# Altium PCB ESP32_S3_TypeC.PcbDoc (part 1 of 2)
Units mil, origin at the board's own origin, x right, y up, seen from the top; angles counter-clockwise.
Board outline 2950 x 1300 mil, 2 copper layers (Top Layer, Bottom Layer), stack 86.615 mil thick; 51 components, 70 nets, 263 pads, 197 vias.
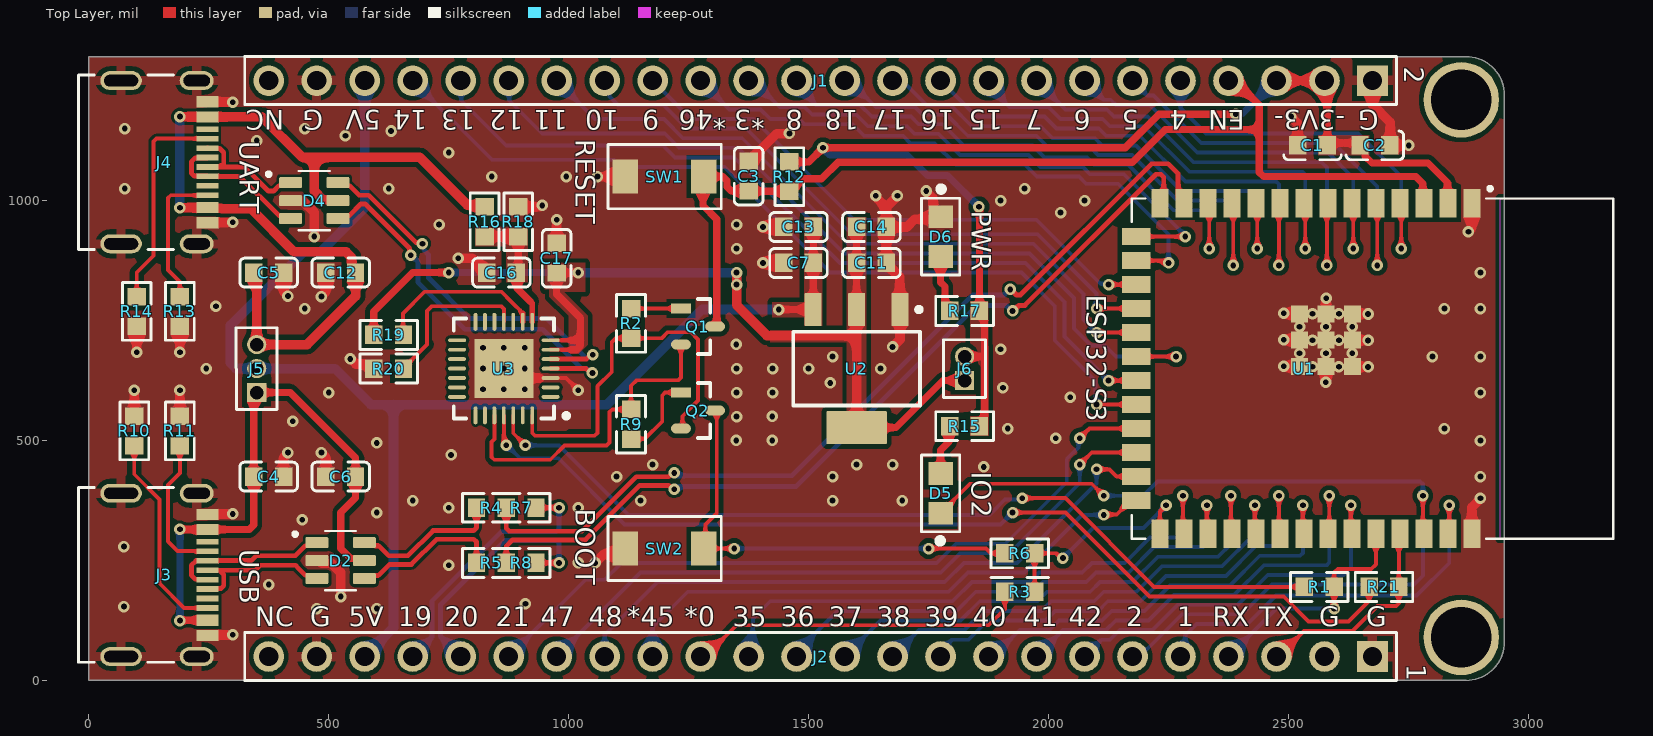
[diagram p0: Top Layer view]
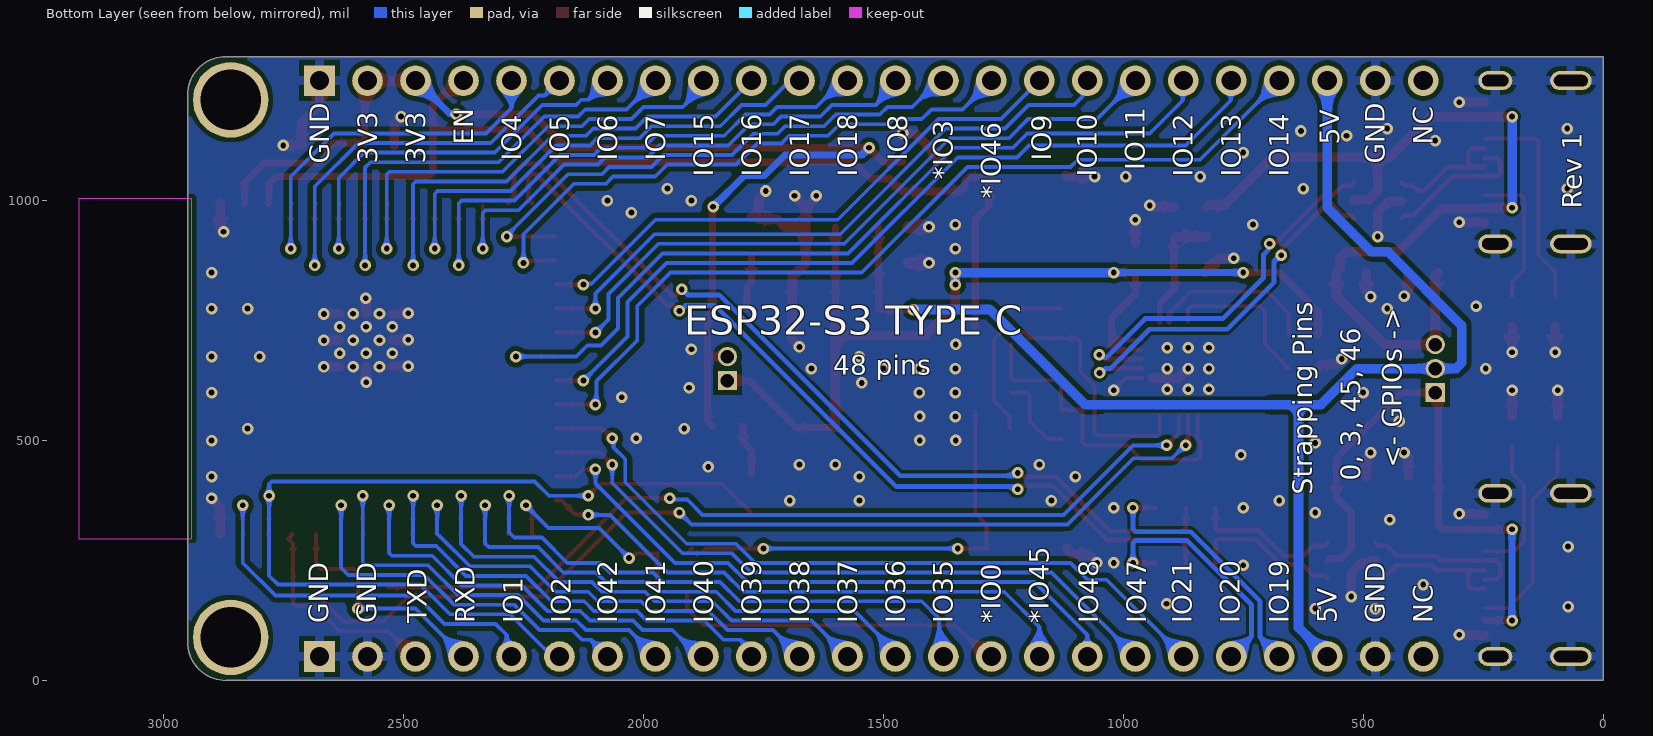
[diagram p1: Bottom Layer view, seen from below]

## Layer stack, top to bottom
Top Solder: solder mask 0.394, Solder Resist, Dk 3.5
Top Layer: signal copper 13.78
Dielectric 1: dielectric 59.055, FR-4, Dk 4.8
Bottom Layer: signal copper 13.78
Bottom Solder: solder mask 0.394, Solder Resist, Dk 3.5

## Board outline
0,0 0,1300 2870,1300 cw(c2870,1220) 2950,1220 2950,80 cw(c2870,80) 2870,0
cut-out: 0,-4900 0,-3900 2500,-3900 2500,-4900 0,-4900 0,-3900 2500,-3900 2500,-4900

## Design rules (kind name [scope] priority, off if disabled: settings)
Clearance DIFF90_Clearance [InDifferentialPairClass('DIFF90')] p1: gap=6 ignorepadtopadclearanceinfootprint=FALSE
Clearance CP2102(Smaller) [WithinRoom('CP2102') or withinRoom('USBC_UART') or WithinRoom('USBC_USB')] p2: gap=6 ignorepadtopadclearanceinfootprint=FALSE
Clearance [All] p3: gap=10 ignorepadtopadclearanceinfootprint=FALSE except(6: SMDPad-SMDPad; 7: Arc-Text Track-Text SMDPad-Text THPad-Text Via-Text Text-Text; 13.78: Arc-THPad Track-THPad)
ComponentClearance R4R7 [InComponent('R4') vs InComponent('R7')] p1: gap=-1 collisioncheckmode=3 verticalgap=0 showdistances=FALSE
ComponentClearance R5R8 [InComponent('R5') vs InComponent('R8')] p2: gap=-1 collisioncheckmode=3 verticalgap=0 showdistances=FALSE
ComponentClearance [All] p3: gap=10 collisioncheckmode=3 verticalgap=10 showdistances=FALSE
DiffPairsRouting DIFF90 [InDifferentialPairClass('DIFF90')] p1: maxlimit=12 minlimit=8 mostfreqgap=10 toplayer_minwidth=10 toplayer_maxwidth=10 toplayer_prefwidth=10 bottomlayer_minwidth=10 bottomlayer_maxwidth=10 bottomlayer_prefwidth=10 maxuncoupledlength=500
Height [All] p1 off: minheight=0 maxheight=1000 prefheight=500
HoleSize [All] p1: absolutevalues=TRUE maxlimit=248.03 minlimit=11.81 maxpercent=80.000 minpercent=20.000
MinimumSolderMaskSliver [All] p1: minsoldermaskwidth=0.1
PolygonConnect [All] p1: thpad.connectstyle=Relief thpad.reliefconductorwidth=20 thpad.reliefentries=4 thpad.polygonreliefangle="90 Angle" thpad.airgapwidth=10 smdpad.connectstyle=Direct smdpad.reliefconductorwidth=10 smdpad.reliefentries=4 smdpad.polygonreliefangle="90 Angle" smdpad.airgapwidth=10 via.connectstyle=Direct via.reliefconductorwidth=10 via.reliefentries=4 via.polygonreliefangle="90 Angle" via.airgapwidth=10
RoomDefinition USBC_USB [False vs False] p1: confinementstyle=ConfineIn formatcopy=TRUE lockcomponents=FALSE outline 315,450 -35,450 -35,-5 315,-5
RoomDefinition USBC_UART [False vs False] p2: confinementstyle=ConfineIn formatcopy=TRUE lockcomponents=FALSE outline 305,875 -35,875 -35,1300 305,1300
RoomDefinition CP2102 [False vs False] p3: confinementstyle=ConfineIn formatcopy=TRUE lockcomponents=FALSE outline 695,790 1050,790 1050,498.79 695,498.79
RoutingVias [All] p1: holewidth=12 width=24 viastyle="Through Hole" minholewidth=12 minwidth=20 maxholewidth=12 maxwidth=24
SilkToSilkClearance [All] p1: silktosilkclearance=6
SilkToSolderMaskClearance [IsPad] p1: minsilkscreentomaskgap=6 clearancetoexposedcopper=TRUE
SolderMaskExpansion [All] p1: expansion=1 istentingtop=FALSE
SupplyNets "Schematic Supply Nets_5" [InNet('3V3_REG')] p1: voltage=0.000
SupplyNets "Schematic Supply Nets_4" [InNet('GND')] p2: voltage=0.000
SupplyNets "Schematic Supply Nets_3" [InNet('5V_VBUS2')] p3: voltage=0.000
SupplyNets "Schematic Supply Nets_2" [InNet('5V_VBUS1')] p4: voltage=0.000
SupplyNets "Schematic Supply Nets_1" [InNet('VCC_5V')] p5: voltage=0.000
SupplyNets "Schematic Supply Nets" [InNet('3V3_EXT')] p6: voltage=0.000
UnRoutedNet [All] p1: checkbadconnections=TRUE
Width [All] p1: maxlimit=30 minlimit=8 preferedwidth=10 minimp=50.000000 maximp=50.000000 favimp=50.000000
22 further rules are at their usual default settings.

## Classes and differential pairs
differential pair class DIFF90: CON CON1_USB CON2_USB CON_HEADER ESP_USB USB_OTG_TVS USB_UART_TVS
differential pair CON2_USB: +CON2_USB_P -CON2_USB_N
differential pair CON1_USB: +CON1_USB_P -CON1_USB_N
differential pair USB_UART_TVS: +USB_UART_TVS_P -USB_UART_TVS_N
differential pair USB_OTG_TVS: +USB_OTG_TVS_P -USB_OTG_TVS_N
differential pair CON_HEADER: +CON_HEADER_P -CON_HEADER_N
differential pair ESP_USB: +ESP_USB_P -ESP_USB_N

## Components (designator, comment, footprint, x,y, rotation, side; value= is the part's Value field where it differs from the comment)
C1 "100nF 0603" CAPC1608X90N 2550,1115 r0 top
C2 "10uF 0603" CAPC1608X90N 2680,1115 r180 top value=10uF
C3 "1uF 0603" CAPC1608X90N 1375,1051 r270 top value=1uF
C4 "10uF 0603" CAPC1608X90N 375,425 r0 top value=10uF
C5 "10uF 0603" CAPC1608X90N 375,850 r0 top value=10uF
C6 "100nF 0603" CAPC1608X90N 525,425 r180 top
C7 "100nF 0603" CAPC1608X90N 1479,870 r0 top
C11 "100nF 0603" CAPC1608X90N 1631,870 r180 top
C12 "100nF 0603" CAPC1608X90N 525,850 r180 top
C13 "10uF 0603" CAPC1608X90N 1479,945 r0 top value=10uF
C14 "10uF 0603" CAPC1608X90N 1631,945 r180 top value=10uF
C16 "1uF 0603" CAPC1608X90N 860,850 r0 top value=1uF
C17 "10uF 0603" CAPC1608X90N 975,880 r270 top value=10uF
D2 "6A 12V 150W 6V Unidirectional 5V SOT-23-6 ESD and Surge Protection (TVS/ESD) ROHS" SOT95P280X145-6N 525,250 r0 top
D4 "6A 12V 150W 6V Unidirectional 5V SOT-23-6 ESD and Surge Protection (TVS/ESD) ROHS" SOT95P280X145-6N 470,1000 r0 top
D5 "LED GREEN CLEAR 0805 SMD" "LED 0805" 1775,390 r270 top
D6 "LED RED CLEAR 0805 SMD" "LED 0805" 1775,925 r90 top
J1 "CONN HEADER VERT 24POS 2.54MM" HEADER_1X24 2675,1250 r270 top locked
J2 "CONN HEADER VERT 24POS 2.54MM" HEADER_1X24 2675,50 r270 top locked
J3 "USB-C 24-Pins" MOLEX_2171790001 157.58,220.08 r270 top locked
J4 "USB-C 24-Pins" MOLEX_2171790001 157.58,1079.92 r270 top locked
J5 "1X3P 1.27mm Header" "HEADER 1X3_1.27MM" 350,600 r180 top
J6 "1X2P 1.27mm Header" "HEADER 1X2_1.27MM" 1825,625 r180 top
Q1 "TRANS NPN 25V 1.5A SOT23-3" FP-SS8050-G-IPC_C 1269.39,737.6 r0 top
Q2 "TRANS NPN 25V 1.5A SOT23-3" FP-SS8050-G-IPC_C 1269.39,562.6 r0 top
R1 "0Ohms 0603" 0603_RES_1/10W 2564,195 r0 top value=0R
R2 "10kOhms 0603" RES1608_0603 1130,744 r90 top value=10kR
R3 "27Ohms 0603" RES1608_0603 1940,185 r0 top value=27R
R4 "0Ohms 0603" 0603_RES_1/10W 839,360 r180 top value=0R
R5 "0Ohms 0603" 0603_RES_1/10W 839,245 r180 top value=0R
R6 "27Ohms 0603" RES1608_0603 1940,265 r0 top value=27R
R7 "0Ohms 0603" 0603_RES_1/10W 901,360 r0 top value=0R
R8 "0Ohms 0603" 0603_RES_1/10W 901,245 r0 top value=0R
R9 "10kOhms 0603" RES1608_0603 1130,534 r270 top value=10kR
R10 "5.1KOhms 0603" RES1608_0603 95,520 r270 top value=5.1kR
R11 "5.1KOhms 0603" RES1608_0603 190,520 r270 top value=5.1kR
R12 "10kOhms 0603" RES1608_0603 1460,1050 r90 top value=10kR
R13 "5.1KOhms 0603" RES1608_0603 190,769 r90 top value=5.1kR
R14 "5.1KOhms 0603" RES1608_0603 100,769 r90 top value=5.1kR
R15 "1KOhms 0603" RES1608_0603 1825,530 r0 top value=1kR
R16 "22.1KOhms 0603" RES1608_0603 825,956 r90 top value=22.1kR
R17 "1KOhms 0603" RES1608_0603 1825,770 r180 top value=1kR
R18 "47.5KOhms 0603" RES1608_0603 895,956 r270 top value=4.75kR
R19 "1KOhms 0603" RES1608_0603 625,720 r0 top value=1kR
R20 "10kOhms 0603" RES1608_0603 625,650 r180 top value=10kR
R21 "0Ohms 0603" 0603_RES_1/10W 2699,195 r0 top value=0R
SW1 "3x4 2pins SMD" SW_TS-1088-AR02016 1200,1050 r0 top
SW2 "3x4 2pins SMD" SW_TS-1088-AR02016 1200,275 r0 top
U1 "ESP32-S3-WROOM1" XCVR_ESP32-S3-WROOM-1-N16R2 2675,650 r270 top locked
U2 "LM1117MP-3.3/NOPB" SOT223-4 1600,650 r270 top
U3 "CP2102-GMR" SLAB-QFN-28-3125X3125TP_M 865,650 r180 top

## Footprints (in the part's own frame and the unit in brackets; to place one, negate y for a bottom-side part, rotate by r counter-clockwise, add the part's x,y. Pads: shape width x height; smd on the part's side, far side on the other; paste and mask are expansions set on the pad)
0603_RES_1/10W [mm] "1608 Metric_0603 Imperial"
  rect 0.92x0.98 smd: 1(-0.787,0) 2(0.787,0)
  silkscreen extent -1.52,-0.76 1.52,0.76, body extent -0.8,-0.4 0.8,0.4, height 0.55
CAPC1608X90N [mm] "1608 Metric_0603 Imperial"
  rect 0.92x0.98 smd: 1(-0.787,0) 2(0.787,0)
  silkscreen extent -1.52,-0.76 1.52,-0.51, body extent -0.8,-0.41 0.8,0.41, height 0.9
FP-SS8050-G-IPC_C [mm] "High Density"
  rect 1.057x0.532 smd paste+0 mask+0: 1(-0.901,0.95)
  rrect100% 1.057x0.532 smd paste+0 mask+0: 2(-0.901,-0.95) 3(0.901,0)
  silkscreen extent 0,-1.45 0.65,1.45, body extent -1.53,-1.55 1.53,1.55, height 0.25
"HEADER 1X2_1.27MM" [mil] "Tin 1A Direct Insert Policy 1mm 2P 3mm -40℃~+105℃ 2.3mm 1.27mm Single Row Brass Black Plugin,P=1.27mm Pin Headers ROHS"
  rect 40x40 hole 28: 1(0,0)
  round 40 hole 28: 2(0,-50)
  silkscreen extent -44,-85 44,35, body extent -41,-75 41,25, height 157
"HEADER 1X3_1.27MM" [mil] "Gold 250V 1A Policy 1mm 3P -40℃~+105℃ 1.27mm Single Row Black Brass 1.27mm 1x3P Plugin,P=1.27mm Pin Headers ROHS"
  rect 40x40 hole 28: 1(0,0)
  round 40 hole 28: 2(0,-50) 3(0,-100)
  silkscreen extent -42,-135 43,35, body extent -42,-125 42,25, height 158
HEADER_1X24 [mil] "TE Connectivity"
  rect 64x64 hole 40: 1(0,0)
  round 64 hole 40: 2(0,-100) 3(0,-200) 4(0,-300) 5(0,-400) 6(0,-500) 7(0,-600) 8(0,-700) 9(0,-800) 10(0,-900) 11(0,-1000) 12(0,-1100) 13(0,-1200) 14(0,-1300) 15(0,-1400) 16(0,-1500) 17(0,-1600) 18(0,-1700) 19(0,-1800) 20(0,-1900) 21(0,-2000) 22(0,-2100) 23(0,-2200) 24(0,-2300)
  silkscreen extent -50,-2350 50,50, body extent -50,-2350 50,50, height 418
"LED 0805" [mm]
  rect 1.2x1.3 smd: 1(-1.05,0) 2(1.05,0)
  silkscreen extent -2.03,-1.02 2.57,1.02, body extent -1,-0.63 1,0.63, height 0.7
MOLEX_2171790001 [mm]
  rect 0.59x1.15 smd mask+0.038: A1B12(-3.2,2.288) A4B9(-2.4,2.288) B1A12(3.2,2.288) B4A9(2.4,2.288)
  rect 0.298x1.15 smd mask+0.038: A5(-1.25,2.288) A6(-0.25,2.288) A7(0.25,2.288) A8(1.25,2.288) B5(1.75,2.288) B6(0.75,2.288) B7(-0.75,2.288) B8(-1.75,2.288)
  oval 1x2.2 hole 0.6 slot 1.8 at 90 deg mask+0.038: S1(-4.32,-2.287) S2(4.32,-2.287)
  oval 1x1.8 hole 0.6 slot 1.4 at 90 deg mask+0.038: S3(-4.32,1.713) S4(4.32,1.713)
  silkscreen extent -4.62,-4.54 4.62,0.49, body extent -4.47,-4.51 4.47,2.24, height 3.27
RES1608_0603 [mm] "1608 Metric_0603 Imperial"
  rect 0.92x0.98 smd: 1(-0.787,0) 2(0.787,0)
  silkscreen extent -1.52,-0.76 1.52,0.76, body extent -0.8,-0.4 0.8,0.4, height 0.55
SLAB-QFN-28-3125X3125TP_M [mm] "QFN, 28-Leads, Body 5x5mm, Pitch 0.5mm, Thermal Pad 3.13x3.13mm, IPC Low Density"
  oval 0.95x0.2 smd mask+0.038: 1(-2.475,1.5) 2(-2.475,1) 3(-2.475,0.5) 4(-2.475,0) 5(-2.475,-0.5) 6(-2.475,-1) 7(-2.475,-1.5) 15(2.475,-1.5) 16(2.475,-1) 17(2.475,-0.5) 18(2.475,0) 19(2.475,0.5) 20(2.475,1) 21(2.475,1.5)
  oval 0.2x0.95 smd mask+0.038: 8(-1.5,-2.475) 9(-1,-2.475) 10(-0.5,-2.475) 11(0,-2.475) 12(0.5,-2.475) 13(1,-2.475) 14(1.5,-2.475) 22(1.5,2.475) 23(1,2.475) 24(0.5,2.475) 25(0,2.475) 26(-0.5,2.475) 27(-1,2.475) 28(-1.5,2.475)
  rect 3.13x3.13 smd mask+0.038: 29(0,0)
  silkscreen extent -3.42,-2.65 2.65,2.65, body extent -2.5,-2.5 2.5,2.5, height 1
SOT95P280X145-6N [mm]
  rrect25% 1.21x0.59 smd: 1(-1.255,0.95) 2(-1.255,0) 3(-1.255,-0.95) 4(1.255,-0.95) 5(1.255,0) 6(1.255,0.95)
  silkscreen extent -2.51,-1.57 0.81,1.57, body extent -1.4,-1.46 1.4,1.46, height 1.42
SOT223-4 [mm] "SOT223, 4-Leads, Body 6.7x3.7mm, Pitch 2.3mm, IPC Medium Density"
  rrect11% 1.75x0.9 smd: 1(-3.125,2.3) 2(-3.125,0) 3(-3.125,-2.3)
  rrect6% 1.75x3.2 smd: 4(3.125,0)
  silkscreen extent -3.25,-3.35 1.95,3.43, body extent -3.5,-3.25 3.5,3.25, height 1.62
SW_TS-1088-AR02016 [mm]
  rect 1.35x1.8 smd: 1(-2.075,0) 2(2.075,0)
  silkscreen extent -3,-1.7 3,1.7, body extent -2.4,-1.45 2.4,1.45, height 2
XCVR_ESP32-S3-WROOM-1-N16R2 [mm]
  rect 1.5x0.9 smd: 2(-8.75,3.99) 3(-8.75,2.72) 4(-8.75,1.45) 5(-8.75,0.18) 6(-8.75,-1.09) 7(-8.75,-2.36) 8(-8.75,-3.63) 9(-8.75,-4.9) 10(-8.75,-6.17) 11(-8.75,-7.44) 12(-8.75,-8.71) 13(-8.75,-9.98) 14(-8.75,-11.25) 27(8.75,-11.25) 28(8.75,-9.98) 29(8.75,-8.71) 30(8.75,-7.44) 31(8.75,-6.17) 32(8.75,-4.9) 33(8.75,-3.63) 34(8.75,-2.36) 35(8.75,-1.09) 36(8.75,0.18) 37(8.75,1.45) 38(8.75,2.72) 39(8.75,3.99) GND(-8.75,5.26) GND(8.75,5.26)
  rect 0.9x1.5 smd: 15(-6.985,-12.5) 16(-5.715,-12.5) 17(-4.445,-12.5) 18(-3.175,-12.5) 19(-1.905,-12.5) 20(-0.635,-12.5) 21(0.635,-12.5) 22(1.905,-12.5) 23(3.175,-12.5) 24(4.445,-12.5) 25(5.715,-12.5) 26(6.985,-12.5)
  rect 0.9x0.9 smd: GND(-2.9,-2.46) GND(-2.9,-1.06) GND(-2.9,-3.86) GND(-1.5,-1.06) GND(-1.5,-2.46) GND(-1.5,-3.86) GND(-0.1,-1.06) GND(-0.1,-2.46) GND(-0.1,-3.86)
  Keep-Out Layer region: 9,6.75 -9,6.75 -9,12.75 9,12.75
  Keep-Out Layer region: 9,6.75 -9,6.75 -9,12.75 9,12.75
  silkscreen extent -9.62,-12.75 9,12.75, body extent -9,-12.75 9,12.75, height 3.25

## Part data
C1 C6 C7 C11 C12: library part CL10E104KC8VPNC, "0.1 µF ±10% 100V Ceramic Capacitor X8L 0603 (1608 Metric)", LCSC Part Number=C2687355, Manufacturer=Samsung, Supplier Part Number=1276-CL10E104KC8VPNCCT-ND, Category="Ceramic Capacitors", Manufacturer Part Number=CL10E104KC8VPNC, Pricing="1=0.27, 10=0.154, 50=0.11, 100=0.0962, 500=0.07284, 1000=0.06554 (USD)", RoHS=No, Stock=57576, Supplier=Digikey
C2 C4 C5 C13 C14 C17: library part CL10A106MQ8NNNC, "10 µF ±20% 6.3V Ceramic Capacitor X5R 0603 (1608 Metric)", Capacitor Type=Ceramic, Case/Package=0603, LCSC Part Number=C385035, Manufacturer=Samsung, Max Operating Temperature=85°C, Min Operating Temperature=-55°C, Package Shape=Rectangular, Package Style=SMTMeter, Rated DC Voltage (URdc)=6.3V, Supplier Part Number=1276-1119-1-ND, Temperature Characteristics Code=X5R, Tolerance  (fill in as +-)=20%, Category="Ceramic Capacitors", ComponentLink1Description=https://datasheet.ciiva.com:443/pdfs/VipMasterIC/IC/SEMS/SEMS-S-A0008522793/SEMS-S-A0008522915-1.pdf?src-supplier=IHS+Markit, ComponentLink1URL=https://datasheet.ciiva.com:443/pdfs/VipMasterIC/IC/SEMS/SEMS-S-A0008522793/SEMS-S-A0008522915-1.pdf?src-supplier=IHS+Markit, ComponentLink2Description=https://datasheet.ciiva.com/25798/cl10a106mq8nnnc-25798320.pdf?src-supplier=Digikey, ComponentLink2URL=https://datasheet.ciiva.com/25798/cl10a106mq8nnnc-25798320.pdf?src-supplier=Digikey, ComponentLink3Description=https://datasheet.ciiva.com/16437/cl05b104kq5nnnc-16437327.pdf?src-supplier=Future+Electronics, ComponentLink3URL=https://datasheet.ciiva.com/16437/cl05b104kq5nnnc-16437327.pdf?src-supplier=Future+Electronics, Dielectric Material=Ceramic, Height=0.8mm, JESD-609 Code=e3, Length=1.6mm, Manufacturer Part Number=CL10A106MQ8NNNC, Mounting Technology="Surface Mount", Multilayer=Yes, Packaging="Tape and Reel", Pins=2, Pricing="1=0.08, 10=0.037, 50=0.0292, 100=0.0216, 500=0.0184, 1000=0.0152, 4000=0.0136, 8000=0.0112, 12000=0.0104, 20000=0.01024 (USD)", Reach SVHC Compliant=Yes, RoHS=Yes, RoHS Compliant=Yes, Stock=1062557, Supplier=Digikey, Terminal Finish=Nickel, Termination=Wraparound, Tolerance (fill in as +-)=20%, Width=0.8mm
C3 C16: library part CL10B105KP8NNNC, "1 µF ±10% 10V Ceramic Capacitor X7R 0603 (1608 Metric)", Capacitor Type=Ceramic, Case/Package=0603, LCSC Part Number=C15849, Manufacturer=Samsung, Max Operating Temperature=125°C, Min Operating Temperature=-55°C, Package Shape=Rectangular, Package Style=SMTMeter, Rated DC Voltage (URdc)=10V, Supplier Part Number=1276-1946-1-ND, Temperature Characteristics Code=X7R, Tolerance  (fill in as +-)=10%, Category="Ceramic Capacitors", ComponentLink1Description=https://datasheet.ciiva.com:443/pdfs/VipMasterIC/IC/SEMS/SEMS-S-A0008526420/SEMS-S-A0008526450-1.pdf?src-supplier=IHS+Markit, ComponentLink1URL=https://datasheet.ciiva.com:443/pdfs/VipMasterIC/IC/SEMS/SEMS-S-A0008526420/SEMS-S-A0008526450-1.pdf?src-supplier=IHS+Markit, ComponentLink2Description=https://datasheet.ciiva.com/25788/cl10b105kp8nnnc-25788304.pdf?src-supplier=Digikey, ComponentLink2URL=https://datasheet.ciiva.com/25788/cl10b105kp8nnnc-25788304.pdf?src-supplier=Digikey, Dielectric Material=Ceramic, Height=0.9mm, JESD-609 Code=e3, Length=1.6mm, Manufacturer Part Number=CL10B105KP8NNNC, Mounting Technology="Surface Mount", Multilayer=Yes, Packaging="Tape and Reel", Pins=2, Pricing="1=0.08, 10=0.014, 50=0.0124, 100=0.0104, 500=0.0092, 1000=0.008, 4000=0.008, 8000=0.00638, 12000=0.006, 20000=0.00559, 28000=0.00535, 40000=0.00511, 100000=0.00461, 200000=0.00431 (USD)", Reach SVHC Compliant=Yes, RoHS=Yes, RoHS Compliant=Yes, Stock=6476393, Supplier=Digikey, Terminal Finish=Nickel, Termination=Wraparound, Tolerance (fill in as +-)=10%, Width=0.8mm
D2 D4: library part USBLC6-2SC6, Clamping Voltage-Max=17V, LCSC Part Number=C2827654, Manufacturer=STMicroelectronics, Max Operating Temperature=125°C, Min Breakdown Voltage=6V, Min Operating Temperature=-40°C, Package Body Material=Plastic, Package Shape=Rectangular, Package Style="SMALL OUTLINEMeter", Peak Reflow Temperature (Cel)=260°C, Rep Pk Reverse Voltage-Max=5V, Supplier Part Number=497-5235-1-ND, Additional Feature="HIGH RELIABILITY", Category="TVS Diodes", ComponentLink1Description=https://datasheet.ciiva.com:443/pdfs/VipMasterIC/IC/SGST/SGSTS30336/SGSTS30336-1.pdf?src-supplier=IHS+Markit, ComponentLink1URL=https://datasheet.ciiva.com:443/pdfs/VipMasterIC/IC/SGST/SGSTS30336/SGSTS30336-1.pdf?src-supplier=IHS+Markit, ComponentLink2Description=https://datasheet.ciiva.com/1268/1690354-1268384.pdf?src-supplier=Element14, ComponentLink2URL=https://datasheet.ciiva.com/1268/1690354-1268384.pdf?src-supplier=Element14, ComponentLink3Description=https://datasheet.ciiva.com/4508/cd00050750-113117-4508433.pdf?src-supplier=Mouser, ComponentLink3URL=https://datasheet.ciiva.com/4508/cd00050750-113117-4508433.pdf?src-supplier=Mouser, ComponentLink4Description=https://datasheet.ciiva.com/41444/001184109-da-01-en-ic-esd-protecti-usblc6-2sc6-sot-23-6-stm-41444156.pdf?src-supplier=Conrad, ComponentLink4URL=https://datasheet.ciiva.com/41444/001184109-da-01-en-ic-esd-protecti-usblc6-2sc6-sot-23-6-stm-41444156.pdf?src-supplier=Conrad, Diode Element Material=SILICON, Diode Type="TRANS VOLTAGE SUPPRESSOR", JESD-30 Code=R-PDSO-G6, JESD-609 Code=e3, Manufacturer Part Number=USBLC6-2SC6, Moisture Sensitivity Level=1, Number of Elements=1, Pins=6, Polarity=Unidirectional, Pricing="1=0.36, 10=0.243, 100=0.1639, 500=0.1269, 1000=0.11458 (USD)", Qualification Status="Not Qualified", Reach SVHC Compliant=Yes, Reference Standard=IEC-61000-4-2, RoHS=Yes, RoHS Compliant=Yes, Stock=105122, Supplier=Digikey, Surface Mount=Yes, Technology=AVALANCHE, Terminal Finish=Tin, Terminal Form="Gull Wing", Terminal Position=DUAL
D5: library part 150080VS75000, "Green 570nm LED Indication - Discrete 2V 0805 (2012 Metric)", Color=Green, Forward Current=30mA, LCSC Part Number=C84257, Manufacturer="Wurth Electronics", Max Operating Temperature=85°C, Min Operating Temperature=-40°C, Supplier Part Number=732-4986-1-ND, Category=LEDs, Channels=1, ComponentLink1Description=https://datasheet.ciiva.com:443/pdfs/VipMasterIC/IC/MIDC/MIDC-S-A0007455962/MIDC-S-A0007455962-1.pdf?src-supplier=IHS+Markit, ComponentLink1URL=https://datasheet.ciiva.com:443/pdfs/VipMasterIC/IC/MIDC/MIDC-S-A0007455962/MIDC-S-A0007455962-1.pdf?src-supplier=IHS+Markit, ComponentLink2Description=https://datasheet.ciiva.com/22656/150080vs75000-22656966.pdf?src-supplier=Element14, ComponentLink2URL=https://datasheet.ciiva.com/22656/150080vs75000-22656966.pdf?src-supplier=Element14, ComponentLink3Description=https://datasheet.ciiva.com/29279/759437-da-01-en-chipled-0805-w-kl-h-gruen-150080vs7500-29279047.pdf?src-supplier=Conrad, ComponentLink3URL=https://datasheet.ciiva.com/29279/759437-da-01-en-chipled-0805-w-kl-h-gruen-150080vs7500-29279047.pdf?src-supplier=Conrad, ComponentLink4Description=https://datasheet.ciiva.com/29563/150080vs75000-29563018.pdf?src-supplier=Digikey, ComponentLink4URL=https://datasheet.ciiva.com/29563/150080vs75000-29563018.pdf?src-supplier=Digikey, Lens Style="WATER CLEAR", Luminous Intensity-Nom=40mcd, Manufacturer Part Number=150080VS75000, Mounting Technology="Surface Mount", Optoelectronic Device Type="SINGLE COLOR LED", Overall Height=0.7mm, Packaging="Tape and Reel", Pins=2, Pricing="1=0.18, 50=0.176, 100=0.151, 500=0.131, 4000=0.131 (USD)", Reach SVHC Compliant=Yes, RoHS=Yes, RoHS Compliant=Yes, Shape=Rectangular, Size=1.4mm, Stock=33035, Supplier=Digikey, Terminal Pitch=2.1mm, Viewing Angle=140°
D6: library part 150080RS75000, "Red 625nm LED Indication - Discrete 2V 0805 (2012 Metric)", Color=Red, Forward Current=30mA, LCSC Part Number=C7496834, Manufacturer="Wurth Electronics", Max Operating Temperature=85°C, Min Operating Temperature=-40°C, Supplier Part Number=732-4984-1-ND, Category=LEDs, Channels=1, ComponentLink1Description=https://datasheet.ciiva.com:443/pdfs/VipMasterIC/IC/MIDC/MIDC-S-A0007455974/MIDC-S-A0007455974-1.pdf?src-supplier=IHS+Markit, ComponentLink1URL=https://datasheet.ciiva.com:443/pdfs/VipMasterIC/IC/MIDC/MIDC-S-A0007455974/MIDC-S-A0007455974-1.pdf?src-supplier=IHS+Markit, ComponentLink2Description=https://datasheet.ciiva.com/22656/150080rs75000-22656961.pdf?src-supplier=Element14, ComponentLink2URL=https://datasheet.ciiva.com/22656/150080rs75000-22656961.pdf?src-supplier=Element14, ComponentLink3Description=https://datasheet.ciiva.com/29279/759435-da-01-en-chipled-0805-w-kl-rot-150080rs75000-29279032.pdf?src-supplier=Conrad, ComponentLink3URL=https://datasheet.ciiva.com/29279/759435-da-01-en-chipled-0805-w-kl-rot-150080rs75000-29279032.pdf?src-supplier=Conrad, Lens Style="WATER CLEAR", Luminous Intensity-Nom=150mcd, Manufacturer Part Number=150080RS75000, Mounting Technology="Surface Mount", Optoelectronic Device Type="SINGLE COLOR LED", Overall Height=0.7mm, Packaging="Tape and Reel", Pins=2, Pricing="1=0.18, 50=0.176, 100=0.151, 500=0.131, 4000=0.131 (USD)", Reach SVHC Compliant=Yes, RoHS=Yes, RoHS Compliant=Yes, Shape=Rectangular, Size=1.4mm, Stock=52184, Supplier=Digikey, Terminal Pitch=2.1mm, Viewing Angle=140°
J1 J2: library part 0022284242, "Connector Header Through Hole 24 position 0.100\" (2.54mm)", LCSC Part Number=C5987590, Manufacturer=Molex, Supplier Part Number=WM50032-24-ND, Category=Uncategorized, ComponentLink1Description=http://components.arrow.com/part/dataview/4705328S3166250N3303?src-supplier=Arrow+Electronics, ComponentLink1URL=http://components.arrow.com/part/dataview/4705328S3166250N3303?src-supplier=Arrow+Electronics, ComponentLink2Description=http://www.molex.com/molex/products/datasheet.jsp?part=active/0022284242_PCB_HEADERS.xml&channel=Products&src-supplier=Avnet, ComponentLink2URL=http://www.molex.com/molex/products/datasheet.jsp?part=active/0022284242_PCB_HEADERS.xml&channel=Products&src-supplier=Avnet, ComponentLink3Description=https://www.molex.com/pdm_docs/sd/022284052_sd.pdf?src-supplier=Digikey, ComponentLink3URL=https://www.molex.com/pdm_docs/sd/022284052_sd.pdf?src-supplier=Digikey, Manufacturer Part Number=0022284242, Pricing="1=1.49, 10=1.119, 100=0.8715, 500=0.75016, 1000=0.70789, 5000=0.62818, 10000=0.6005 (USD)", RoHS=Yes, Supplier=Digikey
J3 J4: library part 217179-0001, "USB-C (USB TYPE-C) USB 2.0 Receptacle Connector 24 (16+8 Dummy) Position Surface Mount, Right Angle; Through Hole", Manufacturer=Molex, Supplier Part Number=900-2171790001CT-ND, Category=Connectors, Manufacturer Part Number=217179-0001, Pricing="1=0.98, 10=0.731, 25=0.6564, 50=0.6074, 100=0.5642, 250=0.51468, 500=0.48234, 1200=0.44689, 2400=0.42258, 3600=0.40973, 6000=0.39484, 8400=0.38577, 12000=0.37675 (USD)", RoHS=No, Stock=14292, Supplier=Digikey
J5: library part FTS-103-01-F-S, "Connector Header Through Hole 3 position 0.050\" (1.27mm)", Flammability Rating="UL94 V-0", LCSC Part Number=C2881648, Manufacturer=Samtec, Manufacturer Series=FTS, Supplier Part Number=612-FTS-103-01-F-S-ND, Additional Feature="Low Profile", Category=Connectors, ComponentLink1Description=https://datasheet.ciiva.com:443/pdfs/VipMasterIC/IC/SAMI/SAMI-S-A0001504673/SAMI-S-A0001504673-1.pdf?src-supplier=IHS+Markit, ComponentLink1URL=https://datasheet.ciiva.com:443/pdfs/VipMasterIC/IC/SAMI/SAMI-S-A0001504673/SAMI-S-A0001504673-1.pdf?src-supplier=IHS+Markit, ComponentLink2Description=http://suddendocs.samtec.com/prints/fts-1xx-xx-xx-xx-xx-mkt.pdf?src-supplier=Digikey, ComponentLink2URL=http://suddendocs.samtec.com/prints/fts-1xx-xx-xx-xx-xx-mkt.pdf?src-supplier=Digikey, ComponentLink3Description=http://www.samtec.com/documents/webfiles/pdf/FTS.pdf?src-supplier=Avnet, ComponentLink3URL=http://www.samtec.com/documents/webfiles/pdf/FTS.pdf?src-supplier=Avnet, ComponentLink4Description=https://datasheet.octopart.com/FTS-103-01-F-S-Samtec-datasheet-116535195.pdf?src-supplier=Toby+Electronics, ComponentLink4URL=https://datasheet.octopart.com/FTS-103-01-F-S-Samtec-datasheet-116535195.pdf?src-supplier=Toby+Electronics, ComponentLink5Description=https://datasheet.octopart.com/FTS-103-01-F-S-Samtec-datasheet-151470456.pdf?src-supplier=Sager+Electronics, ComponentLink5URL=https://datasheet.octopart.com/FTS-103-01-F-S-Samtec-datasheet-151470456.pdf?src-supplier=Sager+Electronics, Connector Type="BOARD CONNECTOR", Contact Finish - Mating="GOLD (3) OVER NICKEL (50)", Contact Finish - Termination="Matte Tin (Sn) - with Nickel (Ni) barrier", Contact Gender=Male, Contact Material=Bronze, DIN Conformance=No, Filter Feature=No, IEC Conformance=No, JESD-609 Code=e3, Manufacturer Part Number=FTS-103-01-F-S, MIL Conformance=No, Mixed Contacts=No, Mounting Style=STRAIGHT, Mounting Technology=Board, Number of Contacts=3, Number of Rows Loaded=1, Option="General Purpose", Pricing="1=0.73, 50=0.6378, 100=0.5407, 500=0.4491, 1000=0.38362, 2000=0.31431, 5000=0.2478, 10000=0.2375 (USD)", Reach SVHC Compliant=Yes, RoHS=Yes, RoHS Compliant=Yes, Stock=2712, Supplier=Digikey, Terminal Pitch=1.27mm, Termination=Solder
J6: library part M50-3530242, "Connector Header Through Hole 2 position 0.050\" (1.27mm)", Flammability Rating="UL94 V-0", LCSC Part Number=C3325334, Manufacturer=Harwin, Supplier Part Number=952-3598-ND, Category="Headers and Wire Housings", ComponentLink1Description=https://datasheet.ciiva.com:443/pdfs/VipMasterIC/IC/HRWN/HRWN-S-A0002541787/HRWN-S-A0002541787-1.pdf?src-supplier=IHS+Markit, ComponentLink1URL=https://datasheet.ciiva.com:443/pdfs/VipMasterIC/IC/HRWN/HRWN-S-A0002541787/HRWN-S-A0002541787-1.pdf?src-supplier=IHS+Markit, ComponentLink2Description=https://cdn.harwin.com/pdfs/Harwin_PC_Connectors_Archer.pdf?src-supplier=Digikey, ComponentLink2URL=https://cdn.harwin.com/pdfs/Harwin_PC_Connectors_Archer.pdf?src-supplier=Digikey, Connector Type="BOARD CONNECTOR", Contact Finish - Mating="NOT SPECIFIED", Contact Gender=Male, DIN Conformance=No, Filter Feature=No, IEC Conformance=No, Manufacturer Part Number=M50-3530242, MIL Conformance=No, Mixed Contacts=No, Mounting Style=STRAIGHT, Mounting Technology=Board, Number of Contacts=2, Number of Rows Loaded=1, Option="General Purpose", Pricing="1=0.1, 10=0.08, 100=0.0655, 500=0.0568, 1000=0.0534, 5000=0.04629, 10000=0.04353 (USD)", Reach SVHC Compliant=Yes, RoHS=Yes, RoHS Compliant=Yes, Stock=9878, Supplier=Digikey, Terminal Pitch=1.27mm, Termination=Solder
Q1 Q2: library part SS8050-G, "Bipolar (BJT) Transistor NPN 25 V 1.5 A 100MHz 300 mW Surface Mount SOT-23-3", LCSC Part Number=C3199946, Manufacturer=Comchip, Supplier Part Number=641-1790-1-ND, Category=Transistors, ComponentLink1Description=https://datasheet.ciiva.com:443/pdfs/VipMasterIC/IC/COMC/COMC-S-A0004994192/COMC-S-A0004994192-1.pdf?src-supplier=IHS+Markit, ComponentLink1URL=https://datasheet.ciiva.com:443/pdfs/VipMasterIC/IC/COMC/COMC-S-A0004994192/COMC-S-A0004994192-1.pdf?src-supplier=IHS+Markit, ComponentLink2Description="http://www.comchiptech.com/admin/files/product/SS8050-G RevA181526.pdf?src-supplier=Digikey", ComponentLink2URL="http://www.comchiptech.com/admin/files/product/SS8050-G RevA181526.pdf?src-supplier=Digikey", Manufacturer Part Number=SS8050-G, Pricing="1=0.17, 10=0.113, 100=0.0755, 500=0.05756, 1000=0.05148 (USD)", Reach SVHC Compliant=Yes, RoHS=Yes, RoHS Compliant=Yes, Stock=93287, Supplier=Digikey
R1 R4 R5 R7 R8 R21: library part RC0603JR-070RL, "0 Ohms Jumper Chip Resistor 0603 (1608 Metric) Moisture Resistant Thick Film", Case/Package=0603, LCSC Part Number=C21189, Manufacturer=Yageo, Max Operating Temperature=155°C, Min Operating Temperature=-55°C, Package Height=0.45mm, Package Length=1.6mm, Package Shape=Rectangular, Package Width=0.8mm, Power=100mW, Rated Temperature=70°C, Resistor Type="FIXED RESISTOR", Supplier Part Number=311-0.0GRCT-ND, Category="Chip SMD Resistors", ComponentLink1Description=https://datasheet.ciiva.com:443/pdfs/VipMasterIC/IC/YAGO/YAGO-S-A0008145938/YAGO-S-A0008145938-1.pdf?src-supplier=IHS+Markit, ComponentLink1URL=https://datasheet.ciiva.com:443/pdfs/VipMasterIC/IC/YAGO/YAGO-S-A0008145938/YAGO-S-A0008145938-1.pdf?src-supplier=IHS+Markit, ComponentLink2Description=https://datasheet.ciiva.com/15189/getdatasheetpartid-329462-15189845.pdf?src-supplier=Verical, ComponentLink2URL=https://datasheet.ciiva.com/15189/getdatasheetpartid-329462-15189845.pdf?src-supplier=Verical, Construction=Chip, JESD-609 Code=e3, Manufacturer Part Number=RC0603JR-070RL, Mounting Technology="Surface Mount", Packaging="Tape and Reel", Pins=2, Pricing="1=0.1, 10=0.009, 25=0.0068, 50=0.004, 100=0.0036, 250=0.00304, 5000=0.00306, 10000=0.00185, 15000=0.00156, 25000=0.00138, 35000=0.00133 (USD)", Reach SVHC Compliant=Yes, RoHS=Yes, RoHS Compliant=Yes, Stock=3708630, Supplier=DigiKey, Technology="METAL GLAZE/THICK FILM", Terminal Finish=Nickel, Termination=Wraparound
R2 R9 R12 R20: library part RC0603FR-0710KL, "10 kOhms ±1% 0.1W, 1/10W Chip Resistor 0603 (1608 Metric) Moisture Resistant Thick Film", Case/Package=0603, LCSC Part Number=C2930027, Manufacturer=Yageo, Max Operating Temperature=155°C, Min Operating Temperature=-55°C, Package Height=0.45mm, Package Length=1.6mm, Package Shape=Rectangular, Package Width=0.8mm, Power=100mW, Rated Temperature=70°C, Resistor Type="FIXED RESISTOR", Supplier Part Number=311-10.0KHRCT-ND, Temperature Coefficient (ppm/Cel)=100, Tolerance=1%, Working Voltage=75V, Additional Feature="LASER TRIMMABLE", Category="Chip SMD Resistors", ComponentLink1Description=https://datasheet.ciiva.com:443/pdfs/VipMasterIC/IC/YAGO/YAGO-S-A0008145938/YAGO-S-A0008145938-1.pdf?src-supplier=IHS+Markit, ComponentLink1URL=https://datasheet.ciiva.com:443/pdfs/VipMasterIC/IC/YAGO/YAGO-S-A0008145938/YAGO-S-A0008145938-1.pdf?src-supplier=IHS+Markit, Construction=Chip, JESD-609 Code=e3, Manufacturer Part Number=RC0603FR-0710KL, Mounting Technology="Surface Mount", Packaging="Tape and Reel", Pins=2, Pricing="1=0.1, 10=0.012, 50=0.0096, 100=0.0071, 500=0.00662, 1000=0.00612, 5000=0.00612, 10000=0.00263, 15000=0.00249, 25000=0.00221, 250000=0.00204, 500000=0.0019 (USD)", Reach SVHC Compliant=Yes, RoHS=Yes, RoHS Compliant=Yes, Stock=5063682, Supplier=Digikey, Technology="METAL GLAZE/THICK FILM", Terminal Finish=Nickel, Termination=Wraparound
R3 R6: library part RC0603FR-0727RL, "27 Ohms ±1% 0.1W, 1/10W Chip Resistor 0603 (1608 Metric) Moisture Resistant Thick Film", Case/Package=0603, LCSC Part Number=C25190, Manufacturer=Yageo, Max Operating Temperature=155°C, Min Operating Temperature=-55°C, Package Height=0.45mm, Package Length=1.6mm, Package Shape=Rectangular, Package Width=0.8mm, Power=100mW, Rated Temperature=70°C, Resistor Type="FIXED RESISTOR", Supplier Part Number=311-27.0HRCT-ND, Temperature Coefficient (ppm/Cel)=100, Tolerance=1%, Working Voltage=75V, Additional Feature="LASER TRIMMABLE", Category="Chip SMD Resistors", ComponentLink1Description=https://datasheet.ciiva.com:443/pdfs/VipMasterIC/IC/YAGO/YAGO-S-A0008145938/YAGO-S-A0008145938-1.pdf?src-supplier=IHS+Markit, ComponentLink1URL=https://datasheet.ciiva.com:443/pdfs/VipMasterIC/IC/YAGO/YAGO-S-A0008145938/YAGO-S-A0008145938-1.pdf?src-supplier=IHS+Markit, ComponentLink2Description=https://datasheet.ciiva.com/2454/pyu-r-int-thick-7-2454030.pdf?src-supplier=Digikey, ComponentLink2URL=https://datasheet.ciiva.com/2454/pyu-r-int-thick-7-2454030.pdf?src-supplier=Digikey, ComponentLink3Description=https://datasheet.ciiva.com/2454/pyu-r-int-thick-7-2454031.pdf?src-supplier=Digikey, ComponentLink3URL=https://datasheet.ciiva.com/2454/pyu-r-int-thick-7-2454031.pdf?src-supplier=Digikey, ComponentLink4Description=https://datasheet.ciiva.com/2454/pyu-r-int-thick-7-2454032.pdf?src-supplier=Digikey, ComponentLink4URL=https://datasheet.ciiva.com/2454/pyu-r-int-thick-7-2454032.pdf?src-supplier=Digikey, ComponentLink5Description=https://datasheet.ciiva.com/7746/443971-7746313.pdf?src-supplier=Element14, ComponentLink5URL=https://datasheet.ciiva.com/7746/443971-7746313.pdf?src-supplier=Element14, ComponentLink6Description=https://datasheet.ciiva.com/7746/443971-7746314.pdf?src-supplier=Element14, ComponentLink6URL=https://datasheet.ciiva.com/7746/443971-7746314.pdf?src-supplier=Element14, Construction=Chip, JESD-609 Code=e3, Manufacturer Part Number=RC0603FR-0727RL, Mounting Technology="Surface Mount", Packaging="Tape and Reel", Pins=2, Pricing="1=0.1, 10=0.011, 50=0.0086, 100=0.0061, 500=0.00562, 1000=0.0051, 5000=0.00408, 10000=0.00306, 15000=0.003 (USD)", Reach SVHC Compliant=Yes, RoHS=Yes, RoHS Compliant=Yes, Stock=313817, Supplier=Digikey, Technology="METAL GLAZE/THICK FILM", Terminal Finish=Nickel, Termination=Wraparound
R10 R11 R13 R14: library part RC0603FR-075K1L, "5.1 kOhms ±1% 0.1W, 1/10W Chip Resistor 0603 (1608 Metric) Moisture Resistant Thick Film", Case/Package=0603, LCSC Part Number=C23186, Manufacturer=Yageo, Max Operating Temperature=155°C, Min Operating Temperature=-55°C, Package Height=0.45mm, Package Length=1.6mm, Package Shape=Rectangular, Package Width=0.8mm, Power=100mW, Rated Temperature=70°C, Resistor Type="FIXED RESISTOR", Supplier Part Number=311-5.10KHRCT-ND, Temperature Coefficient (ppm/Cel)=100, Tolerance=1%, Working Voltage=75V, Additional Feature="LASER TRIMMABLE", Category="Chip SMD Resistors", ComponentLink1Description=https://datasheet.ciiva.com:443/pdfs/VipMasterIC/IC/YAGO/YAGO-S-A0008145938/YAGO-S-A0008145938-1.pdf?src-supplier=IHS+Markit, ComponentLink1URL=https://datasheet.ciiva.com:443/pdfs/VipMasterIC/IC/YAGO/YAGO-S-A0008145938/YAGO-S-A0008145938-1.pdf?src-supplier=IHS+Markit, ComponentLink2Description=https://datasheet.ciiva.com/46395/443971-46395016.pdf?src-supplier=Element14, ComponentLink2URL=https://datasheet.ciiva.com/46395/443971-46395016.pdf?src-supplier=Element14, ComponentLink3Description=https://datasheet.ciiva.com/2454/pyu-r-int-thick-7-2454046.pdf?src-supplier=Digikey, ComponentLink3URL=https://datasheet.ciiva.com/2454/pyu-r-int-thick-7-2454046.pdf?src-supplier=Digikey, ComponentLink4Description=https://datasheet.ciiva.com/2454/pyu-r-int-thick-7-2454047.pdf?src-supplier=Digikey, ComponentLink4URL=https://datasheet.ciiva.com/2454/pyu-r-int-thick-7-2454047.pdf?src-supplier=Digikey, ComponentLink5Description=https://datasheet.ciiva.com/2454/pyu-r-int-thick-7-2454045.pdf?src-supplier=Digikey, ComponentLink5URL=https://datasheet.ciiva.com/2454/pyu-r-int-thick-7-2454045.pdf?src-supplier=Digikey, Construction=Chip, JESD-609 Code=e3, Manufacturer Part Number=RC0603FR-075K1L, Mounting Technology="Surface Mount", Packaging="Tape and Reel", Pins=2, Pricing="1=0.1, 10=0.012, 50=0.0096, 100=0.0071, 500=0.00662, 1000=0.00612, 5000=0.00306, 10000=0.00255, 15000=0.00204, 25000=0.0019 (USD)", Reach SVHC Compliant=Yes, RoHS=Yes, RoHS Compliant=Yes, Stock=1864234, Supplier=Digikey, Technology="METAL GLAZE/THICK FILM", Terminal Finish=Nickel, Termination=Wraparound
R15 R17 R19: library part RC0603FR-071KL, "1 kOhms ±1% 0.1W, 1/10W Chip Resistor 0603 (1608 Metric) Moisture Resistant Thick Film", Case/Package=0603, LCSC Part Number=C21190, Manufacturer=Yageo, Max Operating Temperature=155°C, Min Operating Temperature=-55°C, Package Height=0.45mm, Package Length=1.6mm, Package Shape=Rectangular, Package Width=0.8mm, Power=100mW, Rated Temperature=70°C, Resistor Type="FIXED RESISTOR", Supplier Part Number=311-1.00KHRCT-ND, Temperature Coefficient (ppm/Cel)=100, Tolerance=1%, Working Voltage=75V, Additional Feature="LASER TRIMMABLE", Category="Chip SMD Resistors", ComponentLink1Description=https://datasheet.ciiva.com:443/pdfs/VipMasterIC/IC/YAGO/YAGO-S-A0008145938/YAGO-S-A0008145938-1.pdf?src-supplier=IHS+Markit, ComponentLink1URL=https://datasheet.ciiva.com:443/pdfs/VipMasterIC/IC/YAGO/YAGO-S-A0008145938/YAGO-S-A0008145938-1.pdf?src-supplier=IHS+Markit, Construction=Chip, JESD-609 Code=e3, Manufacturer Part Number=RC0603FR-071KL, Mounting Technology="Surface Mount", Packaging="Tape and Reel", Pins=2, Pricing="1=0.1, 10=0.012, 50=0.0096, 100=0.0071, 500=0.00612, 1000=0.0051, 5000=0.0051, 10000=0.00263, 15000=0.00249, 25000=0.00221, 250000=0.00204, 500000=0.0019 (USD)", Reach SVHC Compliant=Yes, RoHS=Yes, RoHS Compliant=Yes, Stock=5178243, Supplier=Digikey, Technology="METAL GLAZE/THICK FILM", Terminal Finish=Nickel, Termination=Wraparound
R16: library part RC0603FR-0722K1L, "22.1 kOhms ±1% 0.1W, 1/10W Chip Resistor 0603 (1608 Metric) Moisture Resistant Thick Film", Case/Package=0603, LCSC Part Number=C25961, Manufacturer=Yageo, Max Operating Temperature=155°C, Min Operating Temperature=-55°C, Package Height=0.45mm, Package Length=1.6mm, Package Shape=Rectangular, Package Width=0.8mm, Power=100mW, Rated Temperature=70°C, Resistor Type="FIXED RESISTOR", Supplier Part Number=311-22.1KHRCT-ND, Temperature Coefficient (ppm/Cel)=100, Tolerance=1%, Working Voltage=75V, Additional Feature="LASER TRIMMABLE", Category="Chip SMD Resistors", ComponentLink1Description=https://datasheet.ciiva.com:443/pdfs/VipMasterIC/IC/YAGO/YAGO-S-A0008145938/YAGO-S-A0008145938-1.pdf?src-supplier=IHS+Markit, ComponentLink1URL=https://datasheet.ciiva.com:443/pdfs/VipMasterIC/IC/YAGO/YAGO-S-A0008145938/YAGO-S-A0008145938-1.pdf?src-supplier=IHS+Markit, ComponentLink2Description=https://datasheet.ciiva.com/12555/rc0603-272842-12555287.pdf?src-supplier=Mouser, ComponentLink2URL=https://datasheet.ciiva.com/12555/rc0603-272842-12555287.pdf?src-supplier=Mouser, Construction=Chip, JESD-609 Code=e3, Manufacturer Part Number=RC0603FR-0722K1L, Mounting Technology="Surface Mount", Packaging="Tape and Reel", Pins=2, Pricing="1=0.1, 10=0.012, 50=0.0096, 100=0.0071, 500=0.00562, 1000=0.00408, 5000=0.00408, 10000=0.00221, 15000=0.00204, 25000=0.0019 (USD)", Reach SVHC Compliant=Yes, RoHS=Yes, RoHS Compliant=Yes, Stock=53504, Supplier=Digikey, Technology="METAL GLAZE/THICK FILM", Terminal Finish=Nickel, Termination=Wraparound
R18: library part RC0603FR-074K75L, "47.5 kOhms ±1% 0.1W, 1/10W Chip Resistor 0603 (1608 Metric) Moisture Resistant Thick Film", Case/Package=0603, LCSC Part Number=C2933225, Manufacturer=Yageo, Max Operating Temperature=155°C, Min Operating Temperature=-55°C, Package Height=0.45mm, Package Length=1.6mm, Package Shape=Rectangular, Package Width=0.8mm, Power=100mW, Rated Temperature=70°C, Resistor Type="FIXED RESISTOR", Supplier Part Number=311-4.75KHRCT-ND, Temperature Coefficient (ppm/Cel)=100, Tolerance=1%, Working Voltage=75V, Additional Feature="LASER TRIMMABLE", Category="Chip SMD Resistors", ComponentLink1Description=https://datasheet.ciiva.com:443/pdfs/VipMasterIC/IC/YAGO/YAGO-S-A0008145938/YAGO-S-A0008145938-1.pdf?src-supplier=IHS+Markit, ComponentLink1URL=https://datasheet.ciiva.com:443/pdfs/VipMasterIC/IC/YAGO/YAGO-S-A0008145938/YAGO-S-A0008145938-1.pdf?src-supplier=IHS+Markit, Construction=Chip, JESD-609 Code=e3, Manufacturer Part Number=RC0603FR-074K75L, Mounting Technology="Surface Mount", Packaging="Tape and Reel", Pins=2, Pricing="1=0.1, 10=0.012, 50=0.0096, 100=0.0071, 500=0.00612, 1000=0.0051, 5000=0.00306, 10000=0.00221, 15000=0.00204, 25000=0.0019 (USD)", Reach SVHC Compliant=Yes, RoHS=Yes, RoHS Compliant=Yes, Stock=196773, Supplier=Digikey, Technology="METAL GLAZE/THICK FILM", Terminal Finish=Nickel, Termination=Wraparound
SW1 SW2: library part TS-1088-AR02016, "Without 50mA 4mm 100MΩ 100000 Times 12V 160gf 3mm 2mm Round Button Standing paste SPST SMD Tactile Switches ROHS", LCSC Part Number=C720477
U2: "IC REG LINEAR 3.3V 800MA SOT223", LCSC Number Part=C411821, Manufacturer="TI National Semiconductor", Supplier Part Number=LM1117MP-3.3/NOPBCT-ND, Category="Voltage Regulators - Linear", Manufacturer Part Number=LM1117MP-3.3/NOPB, Pricing="1=1.38, 10=1.007, 25=0.9128, 100=0.8093, 250=0.75996, 500=0.73016 (USD)", RoHS=Yes, Stock=63878, Supplier=Digikey
U3: "USB Bridge, USB to UART USB 2.0 UART Interface 28-QFN (5x5)", Case/Package=HVQCCN, Manufacturer="Silicon Labs", Max Operating Temperature=85°C, Max Supply Voltage=3.6V, Min Operating Temperature=-40°C, Min Supply Voltage=3V, Nominal Supply Voltage=3.3V, Package Shape=Square, Package Style="CHIP CARRIER, HEAT SINK/SLUG, VERY THIN PROFILEMeter", Peak Reflow Temperature (Cel)=260°C, Supplier Part Number=336-1160-1-ND, Temperature Grade=INDUSTRIAL, Time @ Peak Reflow Temperature-Max (s)=40s, Category="Interface ICs", ComponentLink1Description=https://datasheet.ciiva.com:443/pdfs/VipMasterIC/IC/SILC/SILCS01275/SILCS01275-1.pdf?src-supplier=IHS+Markit, ComponentLink1URL=https://datasheet.ciiva.com:443/pdfs/VipMasterIC/IC/SILC/SILCS01275/SILCS01275-1.pdf?src-supplier=IHS+Markit, ComponentLink2Description=https://datasheet.ciiva.com/6636/cp2102-9-6636566.pdf?src-supplier=Digikey, ComponentLink2URL=https://datasheet.ciiva.com/6636/cp2102-9-6636566.pdf?src-supplier=Digikey, ComponentLink3Description=https://datasheet.ciiva.com/6636/cp2102-9-6636571.pdf?src-supplier=Digikey, ComponentLink3URL=https://datasheet.ciiva.com/6636/cp2102-9-6636571.pdf?src-supplier=Digikey, Height - Seated (Max)=1mm, JESD-609 Code=e3, Length=5mm, Manufacturer Part Number=CP2102-GMR, Moisture Sensitivity Level=1, Pins=28, Power Supplies=3.3V, Pricing="1=6.54, 10=5.908, 25=5.6328, 100=4.8909, 250=4.83752, 1500=4.8375 (USD)", Qualification Status="Not Qualified", Reach SVHC Compliant=Yes, RoHS=Yes, RoHS Compliant=Yes, Stock=54529, Supplier=Digikey, Surface Mount=Yes, Technology=CMOS, Terminal Finish=Tin, Terminal Form="No Lead", Terminal Pitch=0.5mm, Terminal Position=QUAD, Width=5mm

## Free pads (board coordinates)
  round 157.48 hole 125.98 unplated: 1(2860,90)
  round 157.48 hole 125.98 paste-99999: 2(2860,1210)

## Via types
v1: diameter 24, hole 12, Top Layer to Bottom Layer, tented both sides, 197 vias

## Nets (pads, with @x,y where several pads share a name; then routed paths per layer and width w, separated by ;. In a path a pad name is that pad's centre, name@x,y a point inside that pad or via, vN(x,y) a via of type N, cw(c..) or ccw(c..) an arc to the next point about the centre after c; other vN are vias at no path point)
3V3_EXT: C1.2 C2.2 J1.2 J1.3 J6.2 R12.2 R15.2 R17.1 U1.2 | length 2527.4
  Top Layer w15: R12.2 1460.5,1080.5 1500.5,1080.5 v1(1530,1110) 2160,1110 2230,1180 v1(2390,1180) ; J6.2 1865,675 1866.28,673.72 ; v1(1855,987) 1855,980 1856.28,978.72 R17.1@1856.28,769.72 ; R15.2 1866.28,540.28 1866.28,673.72 ; R17.1 R17.1@1856.28,769.72 ; J1.3 J1.2 2581,1244 C1.2@2581,1130 ; C1.2@2581,1120 C2.2@2646.04,1120 ; C2.2@2646.11,1119.93 2659.61,1106.43 2659.61,1092.57 2673.98,1078.21 2790.79,1078.21 2831.27,1037.73 2831.27,995.3 U1.2 ; R17.1@1856.28,769.72 1866.28,759.72 1866.28,673.72
  Bottom Layer w15: v1(1530,1110) 1545,1095 1705.04,1095 1747.54,1052.5 1789.5,1052.5 v1@1854.6,987.4 ; v1(2390,1180) 2391.72,1181.72 2404.16,1181.72 2472.44,1250 J1.3
3V3_REG: C11.2 C14.2 C17.2 J6.1 R19.1 U2.2 U2.4 U3.6 U3.7 | length 2237.2
  Top Layer w8: U3.6 1005,689.37 ; U3.7 1005,709.06
  Top Layer w15: R19.1 594,769 675,850 v1(750,850) ; 1005,689.37 1016.21,689.37 1025,698.16 1025,709.06 ; 1005,709.06 1025,709.06 ; v1(1020,850) 1019.5,849.5 975.5,849.5 C17.2 975,805 1025,755 1025,709.06 ; U2.4 1681.97,526.97 1780,625 J6.1 ; U2.2 C11.2 C14.2
  Top Layer w20: v1(1350,850) v1(1350,825) 1350,782 1413.42,718.58 1600,718.58 ; U2.4 1600,718.58 ; U2.2 1600,718.58
  Bottom Layer w15: v1(750,850) v1(1020,850)
  Bottom Layer w20: v1(1020,850) v1(1350,850) v1(1350,825)
5V_VBUS1: C4.1 C6.1 D2.5 J3.A4B9 J3.B4A9 J5.1 | length 1208.4
  Top Layer w15: v1(190,125) 190.3,125.3 247.34,125.3 J3.B4A9 ; v1(190,315) 190.43,314.57 J3.A4B9 334.57,314.57 344,324 344,594 J5.1 420,600 556,464 C6.1 556,381 525,350 525,275 545.89,254.11 570.3,254.11 D2.5
  Bottom Layer w15: v1(190,125) v1(190,315)
5V_VBUS2: C5.1 C12.1 D4.5 J4.A4B9 J4.B4A9 J5.3 R16.2 | length 1915.7
  Top Layer w20: v1(190,985) 190.22,985.22 247.42,985.22 J4.B4A9 249.25,983.82 276.18,983.82 277,983 338.17,983 428.17,893 536.17,893 547.89,881.28 547.89,858.11 C12.1 556,801 455,700 J5.3 350,844 C5.1 ; v1(190,1175) 190.3,1174.7 247.34,1174.7 J4.A4B9 360.59,1174.41 445,1090 470,1090 ; D4.5 517.8,1001.61 488.39,1001.61 470,1020 470,1090 ; R16.2 821.09,990.91 789.09,990.91 690,1090 470,1090
  Bottom Layer w20: v1(190,985) v1(190,1175)
BTN_GPIO0: Q2.3 R6.1 SW2.2 | length 944.4
  Top Layer w8: Q2.3@1308.78,562.6 1308.78,348.78 1285,325 1285,278.31 SW2.2 v1(1345,275) ; v1(1750,275) 1870,275 1880,265 R6.1 R6.1@1899,275
  Bottom Layer w8: v1(1345,275) v1(1750,275)
CON1_USB_N: D2.6 R4.2 | length 310.8
  Top Layer w10: D2.6 581.02,280.79 604.21,280.79 625,260 665,260 717.5,312.5 802.14,312.5 808,318.36 R4.2
CON1_USB_P: D2.4 R5.2 | length 313.6
  Top Layer w10: D2.4 581.02,219.21 604.21,219.21 627,242 672.46,242 724.96,294.5 802.14,294.5 808,288.64 R5.2
CON2_USB_N: D4.6 U3.5 | length 809.9
  Top Layer w10: D4.6 526.02,1030.79 543.57,1030.79 563.35,1011 583.17,1011 681.25,912.92 692.56,912.92 v1(695.24,910.24) ; U3.5 1003.98,669.69 1037.14,669.69 1046.46,679 v1(1050,679)
  Bottom Layer w10: v1(695.24,910.24) 697.92,907.56 697.92,897.66 708,887.59 708,838.82 792.74,754.07 954.64,754.07 1035.86,672.86 1040.07,672.86 1046.21,679 v1(1050,679)
CON2_USB_P: D4.4 U3.4 | length 813.4
  Top Layer w10: D4.4 526.02,969.21 543.57,969.21 567.35,993 575.72,993 668.52,900.19 668.52,888.88 v1(671.2,886.2) ; U3.4 1012.13,650 1036.71,650 1045.73,640.98 v1(1049.52,640.98)
  Bottom Layer w10: v1(671.2,886.2) 673.14,886.2 686,873.34 686,829.7 783.63,732.07 945.53,732.07 1027.6,650 1037.14,650 1039.46,647.68 1043.53,647.68 1045,646.21 1045,643 1047.5,643 v1(1049.52,640.98)
CON_GPIO0: J2.15 R3.1 | length 711
  Top Layer w8: J2.15 1285,50 1350,115 1875,115 1909,149 R3.1
CON_HEADER_N: J2.21 R7.2 | length 551.2
  Top Layer w10: R7.2 v1(980,360)
  Bottom Layer w10: J2.21 715,90 715,165 860,310 974.14,310 980,315.86 v1(980,360)
CON_HEADER_P: J2.20 R8.2 | length 519.2
  Top Layer w10: R8.2 v1(980,245)
  Bottom Layer w10: J2.20 733,92 733,157.54 867.46,292 974.14,292 980,286.14 v1(980,245)
DTR_CP2012: Q2.2 R2.1 U3.28 | length 773.9
  Top Layer w8: U3.28 924.06,515.86 929.91,510 1005,510 1054.14,510 1060,515.86 1060,613.28 1090,643.28 1090,705 1098,713 R2.1 1193.22,713 1205.89,725.67 1254.82,725.67 1269.75,710.75 1269.75,583.31 1237.11,550.67 1237.11,528.37 Q2.2
EN: C3.2 J1.4 Q1.3 R12.1 SW1.2 U1.3 | length 2174.2
  Top Layer w15: Q1.3@1308.78,737.6 1308.78,961.22 1280,990 1280,1048.31 SW1.2 1321.21,1050 1330,1041.21 1330,1028.79 1338.79,1020 C3.2 1375.5,1019.5 1459.5,1019.5 R12.1 1461.18,1019 1471.79,1029.61 1471.79,1030.79 1486.39,1045.39 1527.11,1045.39 1561.72,1080 2175,1080 2242.84,1147.84 2439.01,1147.84 ; J1.4 2388.26,1250 2439.01,1199.25 2439.01,1147.84 ; U1.3 2780,996.57 2780,1035 2765,1050 2447.8,1050 2439.01,1058.79 2439.01,1147.84
ESP_USB_N: R4.1 R7.1 U1.13 | length 1852.5
  Top Layer w10: R4.1 870,316.86 875.86,311 1027.54,311 1140.99,424.44 1208.21,424.44 1216.21,432.44 v1(1220,432.44) ; v1(1920,815) 1921.36,815 1932.86,803.5 1941.53,803.5 2214.83,1076.8 2249.34,1076.8 2270,1056.15 2270,1006.57 U1.13
  Bottom Layer w10: v1(1220,432.44) 1223.79,432.44 1229.79,426.44 1465.33,426.44 1842.39,803.5 1907.14,803.5 1918.64,815 v1(1920,815)
ESP_USB_P: R5.1 R8.1 U1.14 | length 1802.3
  Top Layer w10: R8.1 870,280 883,293 1035,293 1148.44,406.44 1208.21,406.44 1216.21,398.44 v1(1220,398.44) ; v1(1925,770) 1926.36,770 1937.86,781.5 1950.64,781.5 2223.94,1054.8 2234.14,1054.8 2240,1048.95 2240,1002.4 U1.14
  Bottom Layer w10: v1(1220,398.44) 1223.79,398.44 1229.79,404.44 1474.44,404.44 1851.5,781.5 1912.14,781.5 1923.64,770 v1(1925,770)
GND: C1.1 C2.1 C3.1 C4.2 C5.2 C6.2 C7.1 C11.1 C12.2 C13.1 C14.1 C16.1 C17.1 D2.2 D4.2 D6.2 J1.1 J1.23 J2.1 J2.2 J2.23 J3.A1B12 J3.B1A12 J3.S1 J3.S2 J3.S3 J3.S4 J4.A1B12 J4.B1A12 J4.S1 J4.S2 J4.S3 J4.S4 R10.1 R11.1 R13.1 R14.1 R18.1 R20.2 SW1.1 SW2.1 U1.GND U2.1 U3.3 U3.29 | length 2788.9
  Top Layer w8: U3.3 994.68,630.31 v1(1020,605)